# Altium PCB Master-PCB.PcbDoc (part 2 of 3)
Units mil, origin at the board's own origin, x right, y up, seen from the top; angles counter-clockwise.
Board outline 3149.61 x 2348 mil, 2 copper layers (Top Layer, Bottom Layer), stack 57 mil thick; 132 components, 59 nets, 410 pads, 547 vias.
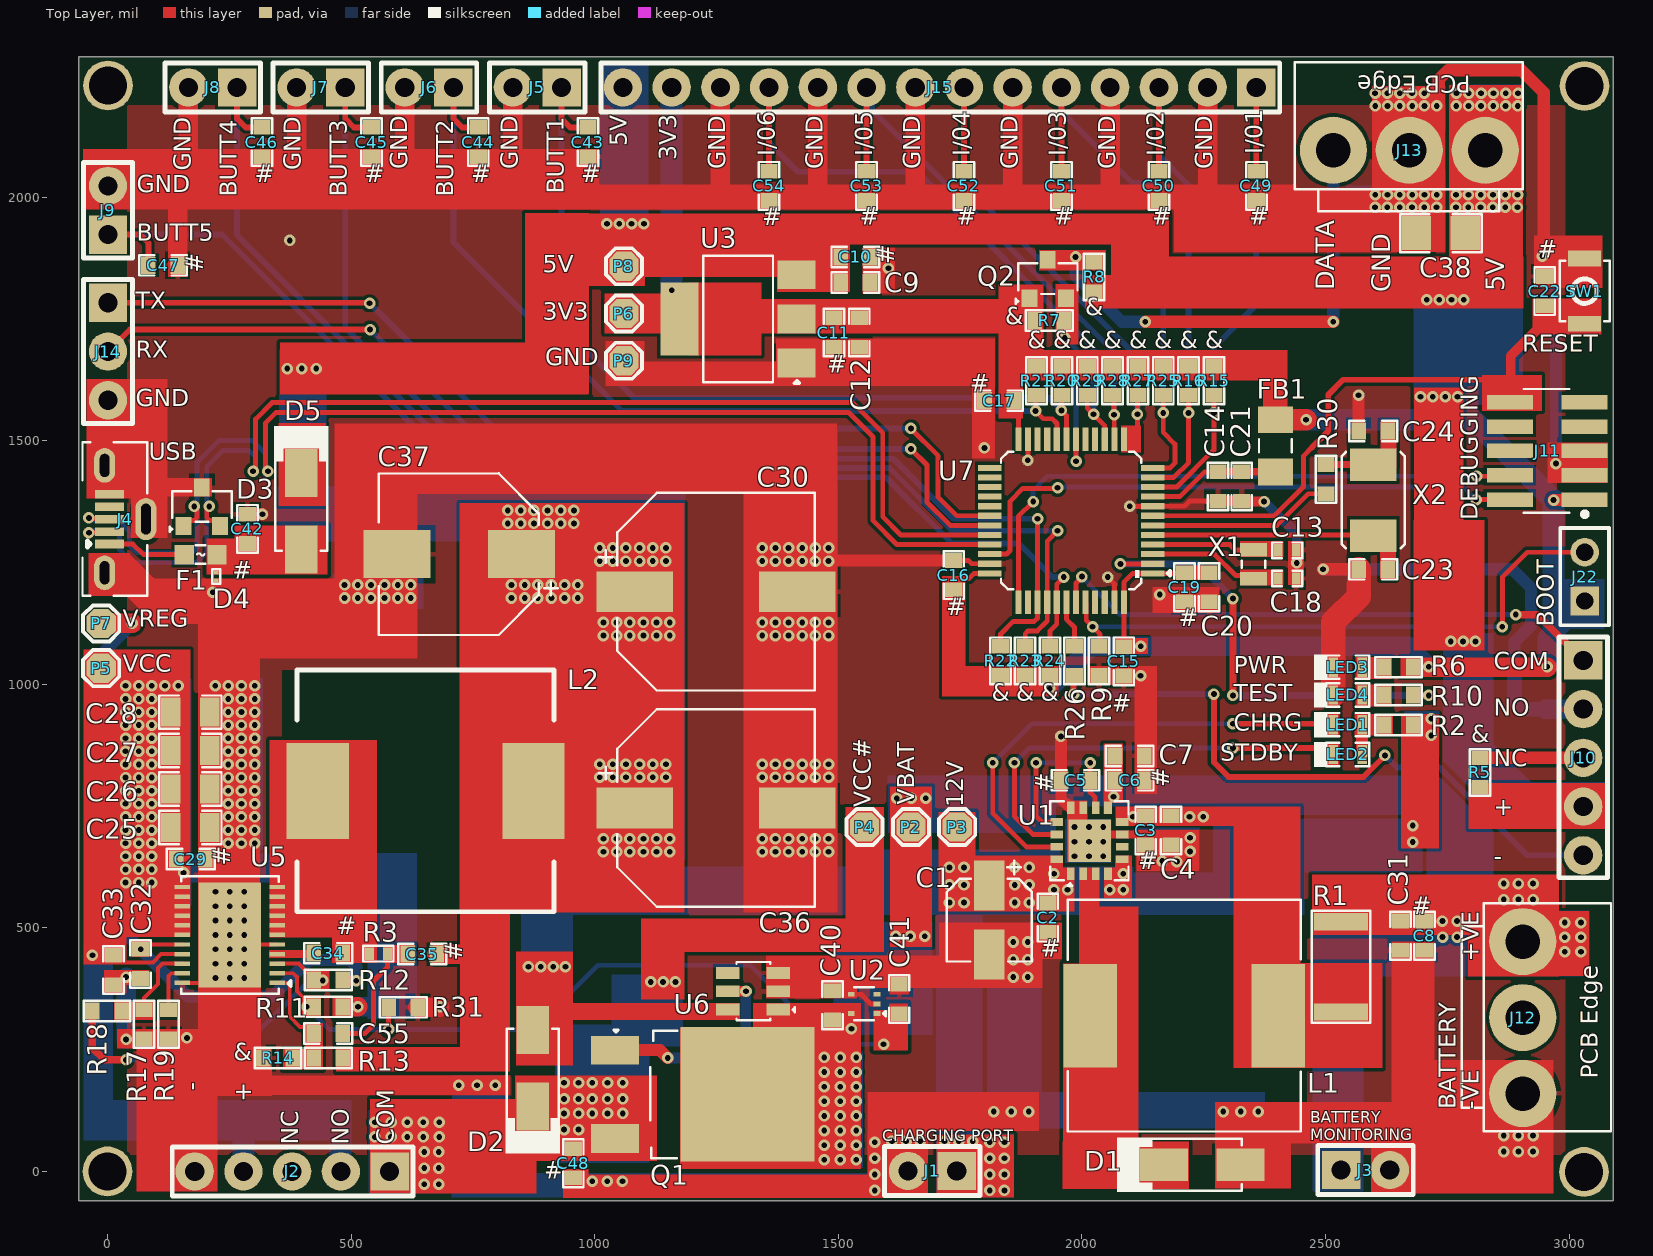
[diagram p0: Top Layer view]

## Part data (continued)
J11: "CONN HEADER SMD 10POS 1.27MM", Color=Black, Contact Resistance=30mR, Current Rating=1A, Insulation Resistance=100MR, LCSC Part Number=C150517, Manufacturer="Amphenol FCI", Max Operating Temperature=85°C, Max Voltage Rating (AC)=125V, Min Operating Temperature=-40°C, Package Quantity=600, Supplier Part Number 1=609-3695-6-ND, ComponentLink1Description=https://www.verical.com/server-webapp/html/getDatasheet?partID=177140&src-supplier=Verical, ComponentLink1URL=https://www.verical.com/server-webapp/html/getDatasheet?partID=177140&src-supplier=Verical, ComponentLink2Description=http://portal.fciconnect.com/Comergent/fci/drawing/20021121.pdf?src-supplier=Avnet, ComponentLink2URL=http://portal.fciconnect.com/Comergent/fci/drawing/20021121.pdf?src-supplier=Avnet, ComponentLink3Description=https://cdn.amphenol-icc.com/media/wysiwyg/files/drawing/20021121.pdf?src-supplier=Digi-Key, ComponentLink3URL=https://cdn.amphenol-icc.com/media/wysiwyg/files/drawing/20021121.pdf?src-supplier=Digi-Key, ComponentLink4Description=http://portal.fciconnect.com/Comergent/fci/drawing/20021121.pdf?src-supplier=Avnet+Europe, ComponentLink4URL=http://portal.fciconnect.com/Comergent/fci/drawing/20021121.pdf?src-supplier=Avnet+Europe, ComponentLink5Description=https://media.digikey.com/pdf/Data%20Sheets/FCI%20PDFs/Minitek%20127_Catalog.pdf?src-supplier=Digi-Key, ComponentLink5URL=https://media.digikey.com/pdf/Data%20Sheets/FCI%20PDFs/Minitek%20127_Catalog.pdf?src-supplier=Digi-Key, ComponentLink6Description=http://portal.fciconnect.com/Comergent//fci/drawing/20021121.pdf?src-supplier=Mouser, ComponentLink6URL=http://portal.fciconnect.com/Comergent//fci/drawing/20021121.pdf?src-supplier=Mouser, Connector Type="Male Pin,Header", Contact Material="Copper Alloy,Copper,Gold", Contact Mating Length=0.12inch, Contact Plating=Gold, Depth=3.4mm, Gender=Male, Housing Color=Black, Housing Material=Thermoplastic, Item Type="Jtag Header", Length=6.35mm, Manufacturer Part Number=20021121-00010C4LF, Mount="Surface Mount", Number of Contacts=10, Number of Positions=10, Number of Rows=2, Orientation=Straight, Packaging="Tape and Reel", Pitch=1.27mm, Pricing 1="1=0.87, 10=0.761, 100=0.6563 (USD)", Radiation Hardening=No, REACH SVHC="No SVHC", Row Spacing=0.05inch, Stack Height=3mm, Stock 1=0, Supplier 1=Digi-Key, Termination=Solder, Voltage Rating=125V
J12: library part B3P-VH(LF)(SN), "1x3P VH 1 3.96mm 3 Brass Plugin,P=3.96mm Wire To Board / Wire To Wire Connector ROHS", LCSC Part Number=C160316, Manufacture="JST Sales America", ComponentLink1Description=LCSC, ComponentLink1URL=https://www.lcsc.com/product-detail/Wire-To-Board-Wire-To-Wire-Connector_JST-Sales-America-B3P-VH-LF-SN_C160316.html, Item Type=Connector, Manufacture part number=B3P-VH(LF)(SN), Pakage=Plugin,P=3.96mm
J13: "1x3P VH 1 3.96mm 3 Brass Plugin,P=3.96mm Wire To Board / Wire To Wire Connector ROHS", LCSC Part Number=C160316, Manufacture="JST Sales America", ComponentLink1Description=LCSC, ComponentLink1URL=https://www.lcsc.com/product-detail/Wire-To-Board-Wire-To-Wire-Connector_JST-Sales-America-B3P-VH-LF-SN_C160316.html, Item Type=Connector, Manufacture part number=B3P-VH(LF)(SN), Pakage=Plugin,P=3.96mm
J14: library part "3P Through Hole Pads", "Wire Connecting Pads", Item Type="Through Hole Pads", Manufacturer Part Number="3P Through Hole Pads"
J15: library part "14P Through Hole Pads", "Wire Connecting Pads", Item Type="Through Hole Pads", Manufacturer Part Number="14P Through Hole Pads"
J22: "KK 254 Breakaway Header, Vertical, 2 Circuits, Tin (Sn) Plating, Mating Pin Length 6.09mm", Color=Black, Contact Resistance=20mR, Current Rating=4A, Flammability Rating="UL94 V-0", LCSC Part Number=C234182, Manufacturer=Molex, Manufacturer Part Number=22-28-4020, Max Operating Temperature=75°C, Max Voltage Rating (AC)=250V, Min Operating Temperature=0°C, Package Quantity=1, Supplier Part Number 1=8967620, Category="Headers and Wire Housings", ComponentLink1Description=https://datasheet.ciiva.com/1433/1596842-1433683.pdf?src-supplier=Element14, ComponentLink1URL=https://datasheet.ciiva.com/1433/1596842-1433683.pdf?src-supplier=Element14, ComponentLink2Description=https://datasheet.ciiva.com/5157/0022284020-pcb-headers-228358-5157523.pdf?src-supplier=Mouser, ComponentLink2URL=https://datasheet.ciiva.com/5157/0022284020-pcb-headers-228358-5157523.pdf?src-supplier=Mouser, ComponentLink3Description=https://datasheet.ciiva.com/30153/214440022284020-pcb-headers-30153261.pdf?src-supplier=Onlinecomponents.com, ComponentLink3URL=https://datasheet.ciiva.com/30153/214440022284020-pcb-headers-30153261.pdf?src-supplier=Onlinecomponents.com, ComponentLink4Description=https://datasheet.ciiva.com/15217/getdatasheetpartid-127875-15217702.pdf?src-supplier=Verical, ComponentLink4URL=https://datasheet.ciiva.com/15217/getdatasheetpartid-127875-15217702.pdf?src-supplier=Verical, ComponentLink5Description=https://datasheet.ciiva.com/10088/0022284020-pcb-headers-10088332.pdf?src-supplier=Avnet, ComponentLink5URL=https://datasheet.ciiva.com/10088/0022284020-pcb-headers-10088332.pdf?src-supplier=Avnet, Connector Type="Male Pin", Contact Material=Brass,Bronze, Contact Mating Length=0.24inch, Contact Plating=Tin, Contact Type="Male Pin", Depth=2.49mm, Gender=Male, Glow Wire Compliant=Non-compliant, Housing Color=Black, Housing Material=Nylon, Item Type=Header, Lead Free="Lead Free", Max Voltage Rating (DC)=250V, Mount="Through Hole", Number of Circuits=2, Number of Contacts=2, Number of Positions=2, Number of Rows=1, Orientation=Straight, Packaging=Bulk, Pitch=2.54mm, Pricing 1="50=0.06100, 150=0.05600, 250=0.05200, 500=0.04900 (GBP)", Radiation Hardening=No, RoHS=Yes, RoHS Compliant=Yes, Series="KK® 42375", Stock 1=29550, Supplier 1=Rs, Termination=Solder, Voltage Rating=250V, Voltage Rating (DC)=250V
L1: library part YPRH1204-220M, "2.9A 22uH ±20% 66mΩ SMD,12x12x5mm Power Inductors ROHS", LCSC Part Number=C338845, Manufacturer=YJYCOIN, Package=SMD,12x12x5mm, ComponentLink1Description=LCSC, ComponentLink1URL=https://www.lcsc.com/product-detail/Power-Inductors_YJYCOIN-YPRH1204-220M_C338845.html, Item Type=Inductor, Manufacturer Part Number=YPRH1204-220M
L2: library part BCIH1367-2R2M, "22A 2.2uH ±20% SMD Power Inductors ROHS", LCSC Part Number=C237973, Manufacturer="BC(Bao Cheng Elec)", Package=SMD, ComponentLink1Description=LCSC, ComponentLink1URL=https://www.lcsc.com/product-detail/Power-Inductors_BC-Bao-Cheng-Elec-BCIH1367-2R2M_C237973.html, Item Type=Inductor, Manufacturer Part Number=BCIH1367-2R2M
LED1: library part NCD0603G2, "Emerald 0603 Light Emitting Diodes (LED) ROHS", LCSC Part Number=C87326, Manufacturer="Foshan NationStar Optoelectronics", Package=0603, ComponentLink1Description=LCSC, ComponentLink1URL=https://www.lcsc.com/product-detail/Light-Emitting-Diodes-LED_Foshan-NationStar-Optoelectronics-NCD0603G2_C87326.html, Item Type=LED, Manufacturer Part Number=NCD0603G2
LED2 LED3 LED4: library part NCD0603R3, "0603 Light Emitting Diodes (LED) ROHS", LCSC Part Number=C3151730, Manufacturer="Foshan NationStar Optoelectronics", Package=0603, ComponentLink1Description=LCSC, ComponentLink1URL=https://www.lcsc.com/product-detail/Light-Emitting-Diodes-LED_Foshan-NationStar-Optoelectronics-NCD0603R3_C3151730.html, Item Type=LED, Manufacturer Part Number=NCD0603R3
P2 P3 P4 P5 P6 P7 P8 P9: "Test Point ON"
Q1: "30V 20A 29W 39mΩ@10V,15A 2.5V@250uA P Channel 1345pF@15V TO-252-2L MOSFETs ROHS", LCSC Part Number=C4748750, Manufacturer="HXY MOSFET", Package=TO-252-2L, ComponentLink1Description=LCSC, ComponentLink1URL=https://www.lcsc.com/product-detail/MOSFETs_HXY-MOSFET-20P03-HXY_C4748750.html, Item Type=Mosfet, Manufacturer Part Number=20P03-HXY
Q2: "50V 220mA 3.5Ω@10V,220mA 225mW 1.6V@1mA N Channel SOT-23 MOSFETs ROHS", LCSC Part Number=C426569, Manufacturer="Slkor(SLKORMICRO Elec.)", Package=SOT-23, ComponentLink1Description=LCSC, ComponentLink1URL=https://www.lcsc.com/product-detail/MOSFETs_Slkor-SLKORMICRO-Elec-BSS138_C426569.html, Item Type=Mosfet, Manufacturer Part Number=BSS138
R1: library part WSL2010R0500FEA, "RES 0.05 OHM 1% 1/2W 2010", Case Code (Imperial)=2010, Case Code (Metric)=5025, LCSC Part Number=C844689, Manufacturer="Vishay Dale", Max Operating Temperature=170°C, Max Power Dissipation=500mW, Min Operating Temperature=-65°C, Package Quantity=1, Resistance=50mR, Resistor Type="Metal Element,Metal Strip", Supplier Part Number 1=WSLE-.05CT-ND, Temperature Coefficient=75ppm/°C, Tolerance=1%, Voltage Rating=150mV, Case/Package=2010, Category="Chip SMD Resistors", ComponentLink1Description=https://datasheet.ciiva.com/2483/wsl-2483729.pdf?src-supplier=Digi-Key, ComponentLink1URL=https://datasheet.ciiva.com/2483/wsl-2483729.pdf?src-supplier=Digi-Key, ComponentLink2Description=https://datasheet.ciiva.com/2483/wsl-2483730.pdf?src-supplier=Digi-Key, ComponentLink2URL=https://datasheet.ciiva.com/2483/wsl-2483730.pdf?src-supplier=Digi-Key, ComponentLink3Description=https://datasheet.ciiva.com/2483/wsl-2483731.pdf?src-supplier=Digi-Key, ComponentLink3URL=https://datasheet.ciiva.com/2483/wsl-2483731.pdf?src-supplier=Digi-Key, ComponentLink4Description=https://datasheet.ciiva.com/7695/wsl-7695158.pdf?src-supplier=Element14, ComponentLink4URL=https://datasheet.ciiva.com/7695/wsl-7695158.pdf?src-supplier=Element14, ComponentLink5Description=https://datasheet.ciiva.com/16215/wsl-16215947.pdf?src-supplier=Future+Electronics, ComponentLink5URL=https://datasheet.ciiva.com/16215/wsl-16215947.pdf?src-supplier=Future+Electronics, ComponentLink6Description=https://datasheet.ciiva.com/17177/wsl-17177243.pdf?src-supplier=Avnet+Europe, ComponentLink6URL=https://datasheet.ciiva.com/17177/wsl-17177243.pdf?src-supplier=Avnet+Europe, ComponentLink7Description=https://datasheet.ciiva.com/28621/1911169-28621837.pdf?src-supplier=Element14, ComponentLink7URL=https://datasheet.ciiva.com/28621/1911169-28621837.pdf?src-supplier=Element14, ComponentLink8Description=https://datasheet.ciiva.com/36857/442550-36857725.pdf?src-supplier=Element14, ComponentLink8URL=https://datasheet.ciiva.com/36857/442550-36857725.pdf?src-supplier=Element14, Contact Plating=Tin,Matte, Depth=2.54mm, Features="Moisture Resistant", Height=0.635mm, Item Type=Resistor, Lead Free="Lead Free", Length=5.08mm, Manufacturer Part Number=WSL2010R0500FEA, Military Standard=Not, Mount="Surface Mount", Number of Pins=2, Number of Terminations=2, Packaging="Tape and Reel", Power Rating=500mW, Pricing 1="1=0.92000, 10=0.81400, 25=0.74800, 50=0.68240, 100=0.59060, 250=0.49876, 500=0.42000, 1000=0.35000 (USD)", Radiation Hardening=No, REACH SVHC="No SVHC", RoHS=No, Stock 1=20000, Supplier 1=Digi-Key, Termination=SMD/SMT, Weight=0.001372oz, Width=0.1inch
R2 R6 R10: library part RT0603DRD071KL, "RES SMD 1K OHM 0.5% 1/10W 0603", Case Code (Imperial)=0603, Case Code (Metric)=1608, LCSC Part Number=C165964, Manufacturer=Yageo, Max Operating Temperature=125°C, Min Operating Temperature=-55°C, Power Rating=100mW, Resistance=1kR, Supplier Part Number 1=311-1.0KDDKR-ND, Temperature Coefficient=25ppm/°C, Tolerance=0.5%, Voltage Rating=75V, Voltage Rating (DC)=50V, Case/Package=0603, ComponentLink1Description=http://www.mouser.com/ds/2/447/yageodocoutput-1125656.pdf?src-supplier=Mouser, ComponentLink1URL=http://www.mouser.com/ds/2/447/yageodocoutput-1125656.pdf?src-supplier=Mouser, ComponentLink2Description=http://www.yageo.com/documents/recent/PYu-RT_1-to-0.05_RoHS_L_6.pdf?src-supplier=Avnet, ComponentLink2URL=http://www.yageo.com/documents/recent/PYu-RT_1-to-0.05_RoHS_L_6.pdf?src-supplier=Avnet, Composition="Thin Film", Contact Plating=Tin,Matte, Lead Free="Lead Free", Manufacturer Part Number=RT0603DRD071KL, Packaging="Tape and Reel", Pricing 1="1=0.2, 10=0.167, 100=0.0651, 1000=0.02725, 2500=0.02498 (USD)", Radiation Hardening=No, Stock 1=178947, Supplier 1=Digi-Key, Termination=SMD/SMT
R3: library part WR04X1541FTL, "62.5mW Thick Film Resistors ±1% 1.54kΩ 0402 Chip Resistor - Surface Mount ROHS", LCSC Part Number=C396136, Manufacturer="Walsin Tech Corp", Package=0402, ComponentLink1Description=LCSC, ComponentLink1URL=https://www.lcsc.com/product-detail/Chip-Resistor-Surface-Mount_Walsin-Tech-Corp-WR04X1541FTL_C396136.html, Item Type=Resistor, Manufacturer Part Number=WR04X1541FTL
R5 R7 R8 R14 R15 R16 R20 R21 R22 R23 R24 R25 R27 R28 R29: library part RT0603BRD0710KL, "RES SMD 10K OHM 0.1% 1/10W 0603", Case/Package=0603, LCSC Part Number=C95204, Manufacturer=Yageo, Max Operating Temperature=155°C, Min Operating Temperature=-55°C, Package Height=0.45mm, Package Length=1.6mm, Package Style=SMTMeter, Package Width=0.8mm, Power=100mW, Rated Temperature=70°C, Resistor Type="FIXED RESISTOR", Supplier Part Number 1=1991391P, Temperature Coefficient=25ppm/°C, Tolerance=0.1%, Working Voltage=75V, Category="Chip SMD Resistors", ComponentLink1Description=https://datasheet.ciiva.com:443/pdfs/VipMasterIC/IC/YAGO/YAGO-S-A0008510989/YAGO-S-A0008510989-1.pdf?src-supplier=IHS+Markit, ComponentLink1URL=https://datasheet.ciiva.com:443/pdfs/VipMasterIC/IC/YAGO/YAGO-S-A0008510989/YAGO-S-A0008510989-1.pdf?src-supplier=IHS+Markit, ComponentLink2Description=https://datasheet.ciiva.com/5624/pyu-rt-1-to-0-05-rohs-l-4-5624351.pdf?src-supplier=Mouser, ComponentLink2URL=https://datasheet.ciiva.com/5624/pyu-rt-1-to-0-05-rohs-l-4-5624351.pdf?src-supplier=Mouser, ComponentLink3Description=https://datasheet.ciiva.com/29721/pyu-rt-1-to-0-05-rohs-l-4-29721177.pdf?src-supplier=Digi-Key, ComponentLink3URL=https://datasheet.ciiva.com/29721/pyu-rt-1-to-0-05-rohs-l-4-29721177.pdf?src-supplier=Digi-Key, Construction=Chip, Item Type=Resistor, Manufacturer Part Number=RT0603BRD0710KL, Mounting Technology="Surface Mount", Packaging="Tape and Reel", Pins=2, Pricing 1="100=0.29800, 250=0.27800, 500=0.25900, 1000=0.23700 (GBP)", Reach SVHC Compliant=Yes, RoHS=Yes, RoHS Compliant=Yes, Stock 1=20510, Supplier 1=Rs, Technology="THIN FILM", Termination=Wraparound
R9: library part RT0603BRD0733KL, "RES SMD 33K OHM 0.1% 1/10W 0603", Case Code (Imperial)=0603, Case Code (Metric)=1608, LCSC Part Number=C705768, Manufacturer=Yageo, Max Operating Temperature=125°C, Max Power Dissipation=100mW, Min Operating Temperature=-55°C, Package Quantity=5000, Resistance=33kR, Resistor Type="Thin Film", Temperature Coefficient=25ppm/°C, Voltage Rating=75V, Voltage Rating (DC)=50V, Case/Package=0603, Category="Chip SMD Resistors", ComponentLink1Description=https://datasheet.ciiva.com/2585/pyu-rt-1-to-0-05-rohs-l-4-2585891.pdf?src-supplier=Digi-Key, ComponentLink1URL=https://datasheet.ciiva.com/2585/pyu-rt-1-to-0-05-rohs-l-4-2585891.pdf?src-supplier=Digi-Key, ComponentLink2Description=https://datasheet.ciiva.com/12810/pyu-rt-1-to-0-05-rohs-l-4-12810117.pdf?src-supplier=Mouser, ComponentLink2URL=https://datasheet.ciiva.com/12810/pyu-rt-1-to-0-05-rohs-l-4-12810117.pdf?src-supplier=Mouser, ComponentLink3Description=https://datasheet.ciiva.com/8889/pyu-rt-1-to-0-05-rohs-l-4-8889590.pdf?src-supplier=Avnet, ComponentLink3URL=https://datasheet.ciiva.com/8889/pyu-rt-1-to-0-05-rohs-l-4-8889590.pdf?src-supplier=Avnet, Construction=Rectangular, Contact Plating=Tin,Matte, Depth=0.8mm, Features="Moisture Resistant", Height=0.022inch, Lead Free="Lead Free", Length=1.6mm, Manufacturer Part Number=RT0603BRD0733KL, Military Standard=Not, Number of Terminations=2, Packaging="Tape and Reel", Power Rating=100mW, Pricing 1="1=0.30860 (USD)", Radiation Hardening=No, RoHS=Yes, RoHS Compliant=Yes, Series=RT, Size Code=0603, Stock 1=2, Supplier 1="Arrow Electronics", Supplier Part Number 1=RT0603BRD0733KL, Termination=SMD/SMT, Weight=7.1E-05oz, Width=0.031inch
R11 R12: library part RC0603JR-07100KL, "RES 100K OHM 5% 1/10W 0603", Case Code (Imperial)=0603, Case Code (Metric)=1608, LCSC Part Number=C100048, Manufacturer=Yageo, Max Operating Temperature=155°C, Max Power Dissipation=100mW, Min Operating Temperature=-55°C, Resistance=100kR, Resistance Tolerance=5%, Resistor Type="Thick Film", Supplier Part Number 1=311-100KGRCT-ND, Temperature Coefficient=100ppm/°C, Voltage Rating=50V, Case/Package=0603, Category="Chip SMD Resistors", ComponentLink1Description=https://datasheet.ciiva.com/7746/443971-7746424.pdf?src-supplier=Element14, ComponentLink1URL=https://datasheet.ciiva.com/7746/443971-7746424.pdf?src-supplier=Element14, ComponentLink2Description=https://datasheet.ciiva.com/7983/443971-7983686.pdf?src-supplier=Element14, ComponentLink2URL=https://datasheet.ciiva.com/7983/443971-7983686.pdf?src-supplier=Element14, ComponentLink3Description=https://datasheet.ciiva.com/7746/443971-7746423.pdf?src-supplier=Element14, ComponentLink3URL=https://datasheet.ciiva.com/7746/443971-7746423.pdf?src-supplier=Element14, ComponentLink4Description=https://datasheet.ciiva.com/8887/pyu-rc0603-51-rohs-l-4-8887903.pdf?src-supplier=Avnet, ComponentLink4URL=https://datasheet.ciiva.com/8887/pyu-rc0603-51-rohs-l-4-8887903.pdf?src-supplier=Avnet, Contact Plating=Tin,Matte, Features="Moisture Resistant", Lead Free="Lead Free", Manufacturer Part Number=RC0603JR-07100KL, Number of Pins=2, Number of Terminations=2, Packaging="Tape and Reel", Power Rating=100mW, Pricing 1="1=0.10000, 10=0.02000, 100=0.00800, 1000=0.00360, 2500=0.00312 (USD)", Radiation Hardening=No, REACH SVHC="No SVHC", RoHS=Yes, RoHS Compliant=Yes, Series=RC, Size Code=0603, Stock 1=1210037, Supplier 1=Digi-Key, Termination=SMD/SMT, Tolerance=5%, Voltage Rating (DC)=50V, Width=0.8mm
R13: library part RT0603BRD0773K2L, "RES SMD 73.2KOHM 0.1% 1/10W 0603", Case Code (Imperial)=0603, Case Code (Metric)=1608, LCSC Part Number=C861548, Manufacturer=Yageo, Max Operating Temperature=125°C, Min Operating Temperature=-55°C, Power Rating=100mW, Supplier Part Number=YAG4591CT-ND, Temperature Coefficient=25ppm/°C, Tolerance=0.1%, Voltage Rating=75V, Voltage Rating (DC)=50V, Case/Package=0603, Category="Chip SMD Resistors", ComponentLink1Description=https://datasheet.ciiva.com/12810/pyu-rt-1-to-0-05-rohs-l-4-12810634.pdf?src-supplier=Mouser, ComponentLink1URL=https://datasheet.ciiva.com/12810/pyu-rt-1-to-0-05-rohs-l-4-12810634.pdf?src-supplier=Mouser, Height=0.45mm, Item Type=Resistor, Lead Free="Lead Free", Length=1.6mm, Manufacturer Part Number=RT0603BRD0773K2L, Packaging="Tape and Reel", Pricing="1=0.34, 10=0.288, 100=0.1126, 500=0.06812, 1000=0.04716, 2500=0.04322 (USD)", RoHS=Yes, RoHS Compliant=Yes, Series=RT, Stock=4471, Supplier=Digi-Key, Termination=SMD/SMT, Weight=7.1E-05oz, Width=0.8mm
R17: library part RC0603FR-07475KL, "RES 475K OHM 1% 1/10W 0603", LCSC Part Number=C137717, Manufacturer=YAGEO, Item Type=Resistor, Manufacturer Part Number=RC0603FR-07475KL
R18: library part RC0603FR-07200KL, "RES SMD 200K OHM 1% 1/10W 0603", LCSC Part Number=C105574, Manufacturer=Yageo, Package=0603, ComponentLink3Description=LCSC, ComponentLink3URL=https://www.lcsc.com/product-detail/Chip-Resistor-Surface-Mount_YAGEO-RC0603FR-07200KL_C105574.html, Item Type=Resistor, Manufacturer Part Number=RC0603FR-07200KL
R19: library part RT0603DRD07147KL, "RES SMD 147K OHM 0.5% 1/10W 0603", Case Code (Imperial)=0603, Case Code (Metric)=1608, LCSC Part Number=C728612, Manufacturer=Yageo, Max Operating Temperature=155°C, Max Power Dissipation=100mW, Min Operating Temperature=-55°C, Package Quantity=10, Supplier Part Number 1=603-RT0603DRD07147KL, Temperature Coefficient=25ppm/°C, Tolerance=0.5%, Voltage Rating (DC)=50V, Case/Package=0603, Category="Chip SMD Resistors", ComponentLink1Description=http://www.yageo.com/documents/recent/PYu-RT_1-to-0.01_RoHS_L_9.pdf?src-supplier=Digi-Key, ComponentLink1URL=http://www.yageo.com/documents/recent/PYu-RT_1-to-0.01_RoHS_L_9.pdf?src-supplier=Digi-Key, Height=0.45mm, Item Type=Resistor, Lead Free="Lead Free", Length=1.6mm, Manufacturer Part Number=RT0603DRD07147KL, Number of Terminations=2, Packaging="Tape and Reel", Power Rating=100mW, Pricing 1="1=0.18000, 10=0.14700, 50=0.14700, 100=0.05600, 1000=0.02400, 10000=0.01800 (USD)", RoHS=Yes, RoHS Compliant=Yes, Series=RT, Stock 1=1848, Supplier 1=Mouser, Width=0.8mm
R26: library part RT0603DRD07200RL, "RES SMD 200 OHM 0.5% 1/10W 0603", Case/Package=0603, LCSC Part Number=C700498, Manufacturer=Yageo, Power Rating=100mW, Supplier Part Number 1=311-200DCT-ND, Tolerance=0.5%, Voltage Rating (DC)=50V, Lead Free="Lead Free", Manufacturer Part Number=RT0603DRD07200RL, Packaging="Cut Tape", Pricing 1="1=0.21, 10=0.174, 100=0.0682, 1000=0.02855, 2500=0.02617 (USD)", Resistance=200R, Stock 1=19572, Supplier 1=Digi-Key
R30: library part RC0603JR-07390RL, "RES SMD 390 OHM 5% 1/10W 0603", LCSC Part Number=C137632, Manufacturer=Yageo, Package=0603, ComponentLink4Description=LCSC, ComponentLink4URL=https://www.lcsc.com/product-detail/Chip-Resistor-Surface-Mount_YAGEO-RC0603JR-07390RL_C137632.html, Item Type=Resistor, Manufacturer Part Number=RC0603JR-07390RL
R31: library part PNM0603E5002BST5, "RES SMD 50K OHM 0.1% 0.15W 0603", Case Code (Imperial)=0603, Case Code (Metric)=1608, LCSC Part Number=C2073717, Manufacturer="Vishay Dale Thin Film", Max Operating Temperature=125°C, Min Operating Temperature=-55°C, Power Rating=150mW, Resistance=50kR, Supplier Part Number 1=PNM0603-50KBDKR-ND, Temperature Coefficient=25ppm/°C, Tolerance=0.1%, Voltage Rating=75V, Case/Package=0603, ComponentLink1Description=LCSC, ComponentLink1URL=https://www.lcsc.com/product-detail/Chip-Resistor-Surface-Mount_Vishay-Intertech-PNM0603E5002BST5_C2073717.html, Composition="Thin Film", Contact Plating=Copper,Tin,Silver, Height=0.02inch, Length=0.064inch, Manufacturer Part Number=PNM0603E5002BST5, Packaging="Tape and Reel", Pricing 1="1=3.07, 10=2.743, 100=2.0299 (USD)", Radiation Hardening=No, REACH SVHC=Unknown, Stock 1=16518, Supplier 1=Digi-Key, Termination=SMD/SMT, Voltage Rating (DC)=75V, Width=0.032inch
SW1: "SWITCH TACTILE SPST-NO 0.05A 12V", Contact Current Rating=50mA, Contact Resistance=100mR, Insulation Resistance=100MR, LCSC Part Number=C231329, Manufacturer=Omron, Max Operating Temperature=70°C, Max Voltage Rating (DC)=12V, Min Operating Temperature=-25°C, Operating Force=1.5N, Package Quantity=1, Ratings="Dust Proof,IP40", Supplier Part Number 1=SW1020DKR-ND, Actuator Length=0.4mm, Actuator Type=Standard, ComponentLink1Description=http://www.farnell.com/datasheets/60838.pdf?src-supplier=Farnell, ComponentLink1URL=http://www.farnell.com/datasheets/60838.pdf?src-supplier=Farnell, ComponentLink2Description=http://www.farnell.com/datasheets/60838.pdf?src-supplier=Element14, ComponentLink2URL=http://www.farnell.com/datasheets/60838.pdf?src-supplier=Element14, ComponentLink3Description=https://omronfs.omron.com/en_US/ecb/products/pdf/en-b3u.pdf?src-supplier=Digi-Key, ComponentLink3URL=https://omronfs.omron.com/en_US/ecb/products/pdf/en-b3u.pdf?src-supplier=Digi-Key, ComponentLink4Description=http://www.omron.com/ecb/products/pdf/en-b3u.pdf?src-supplier=Digi-Key, ComponentLink4URL=http://www.omron.com/ecb/products/pdf/en-b3u.pdf?src-supplier=Digi-Key, ComponentLink5Description=https://www.distrelec.biz/Web/Downloads/he/et/B3U_eng_datasheet.pdf?mime=application%2Fpdf&src-supplier=Distrelec, ComponentLink5URL=https://www.distrelec.biz/Web/Downloads/he/et/B3U_eng_datasheet.pdf?mime=application%2Fpdf&src-supplier=Distrelec, ComponentLink6Description=http://www.onlinecomponents.com/productFiles/mf-OM/en-b3u.pdf?src-supplier=Onlinecomponents.com, ComponentLink6URL=http://www.onlinecomponents.com/productFiles/mf-OM/en-b3u.pdf?src-supplier=Onlinecomponents.com, ComponentLink7Description=https://www.verical.com/server-webapp/html/getDatasheet?partID=552554&src-supplier=Verical, ComponentLink7URL=https://www.verical.com/server-webapp/html/getDatasheet?partID=552554&src-supplier=Verical, ComponentLink8Description=http://www.farnell.com/datasheets/1685550.pdf?src-supplier=Element14, ComponentLink8URL=http://www.farnell.com/datasheets/1685550.pdf?src-supplier=Element14, ComponentLink9Description=http://www.farnell.com/datasheets/2610940.pdf?src-supplier=Farnell, ComponentLink9URL=http://www.farnell.com/datasheets/2610940.pdf?src-supplier=Farnell, ComponentLink10Description=https://www.alliedelec.com/m/d/4c8a9ef82804fc3c241a13c1e298fd73.pdf?src-supplier=Allied+Electronics, ComponentLink10URL=https://www.alliedelec.com/m/d/4c8a9ef82804fc3c241a13c1e298fd73.pdf?src-supplier=Allied+Electronics, Contact Material=Silver, Current Rating=50mA, Depth=2.5mm, Electrical Life=200000Cycles, Height=1.2mm, Illumination Type=Non-Illuminated,Illuminated, Item Type=Switch, Lead Free="Lead Free", Length=4mm, Manufacturer Part Number=B3U-1000P, Max Current Rating=50mA, Mechanical Life=200000Cycles, Mount="Surface Mount", Orientation=Straight, Packaging="Tape and Reel", Pricing 1="1=1, 10=0.961, 25=0.9064, 50=0.7976, 100=0.7251, 250=0.68888, 500=0.67074, 1000=0.52571 (USD)", REACH SVHC=Unknown, Stock 1=116454, Supplier 1=Digi-Key, Switch Function=Off-Mom, Switch Travel=0.15mm, Termination=SMD/SMT, Throw Configuration=SPST, Voltage Rating (DC)=12V, Weight=0.000776oz, Width=3mm
U1: "TQFN-16-EP(4x4) Battery Management ICs ROHS", LCSC Part Number=C379389, Manufacturer="TOPPOWER(Nanjing Extension Microelectronics)", Package=TQFN-16-EP(4x4), ComponentLink1Description=LCSC, ComponentLink1URL=https://www.lcsc.com/product-detail/Battery-Management-ICs_TOPPOWER-Nanjing-Extension-Microelectronics-TP5100_C379389.html, Item Type=IC, Manufacturer Part Number=TP5100
U2: "IC SUPERVISOR 1 CHANNEL 5VSOF", Case/Package=VSOF, LCSC Part Number=C509824, Manufacturer=Rohm, Max Operating Temperature=105°C, Max Power Dissipation=210mW, Max Reset Threshold Voltage=6.09V, Max Supply Current=1.98uA, Max Supply Voltage=10V, Min Operating Temperature=-40°C, Min Reset Threshold Voltage=5.91V, Min Supply Voltage=1.2V, Number of Voltages Monitored=1, Operating Supply Current=900nA, Package Quantity=3000, Supplier Part Number 1=BD4860FVE-CT-ND, Threshold Voltage=6V, Accuracy=1%, Category="Voltage Supervisors", ComponentLink1Description=https://datasheet.ciiva.com/1974/bd48xxg-e-1974994.pdf?src-supplier=Digi-Key, ComponentLink1URL=https://datasheet.ciiva.com/1974/bd48xxg-e-1974994.pdf?src-supplier=Digi-Key, ComponentLink2Description=https://datasheet.ciiva.com/8133/bd48xxg-e-8133113.pdf?src-supplier=Avnet, ComponentLink2URL=https://datasheet.ciiva.com/8133/bd48xxg-e-8133113.pdf?src-supplier=Avnet, Item Type=IC, Lead Free="Lead Free", Manufacturer Part Number=BD4860FVE-TR, Mounting Technology="Surface Mount", Number of Monitored Inputs=1, Packaging="Tape and Reel", Pins=5, Pricing 1="1=0.64000, 10=0.54900, 25=0.51200, 100=0.40960, 250=0.38032, 500=0.32182, 1000=0.24868 (USD)", Reset="Active Low", RoHS=Yes, RoHS Compliant=Yes, Series=BD48xxx, Stock 1=5990, Supplier 1=Digi-Key, Type="Simple Reset/Power-On Reset,Voltage Detector", Watchdog Timer=No
U3: "15V 1.3V @ 800mA Fixed 3.3V SOT-223 Linear Voltage Regulators (LDO) ROHS", LCSC Part Number=C92102, Manufacturer="Diodes Incorporated", Package=SOT-223, Item Type=IC, Manufacturer Part Number=AZ1117CH-3.3TRG1
U5: "IC REG BUCK ADJUSTABLE 14A 22SON", Case/Package=SON, LCSC Part Number=C181971, Manufacturer="Texas Instruments", Max Input Voltage=22V, Max Operating Temperature=85°C, Max Output current=14A, Max Output Voltage=5.5V, Min Input Voltage=1.5V, Min Operating Temperature=-40°C, Min Output Voltage=600mV, Package Quantity=2500, Quiescent Current=320uA, Switching Frequency=1MHz, Category="Voltage Regulators - Switching", ComponentLink1Description=https://datasheet.ciiva.com/6605/tps53318-6605682.pdf?src-supplier=Digi-Key, ComponentLink1URL=https://datasheet.ciiva.com/6605/tps53318-6605682.pdf?src-supplier=Digi-Key, ComponentLink2Description=LCSC, ComponentLink2URL=https://www.lcsc.com/product-detail/DC-DC-Converters_Texas-Instruments-TPS53319DQPR_C181971.html, Contact Plating=Gold, Efficiency=91%, Item Type=IC, Lead Free="Contains Lead", Manufacturer Part Number=TPS53319DQPR, Mount="Surface Mount", Number of Outputs=1, Number of Pins=22, Output Configuration=Positive, Output Current=14A, Output Type=Adjustable, Output Voltage=5.5V, Packaging="Tape and Reel", Radiation Hardening=No, RoHS=Yes, RoHS Compliant=Yes, Series="D-CAP™, Eco-Mode™", Supplier 1=Newark, Synchronous Rectifier=Yes
U6: "IC OR CTRLR SRC SELECT TSOT23-6", Case/Package=SOT-23-6, LCSC Part Number=C521306, Manufacturer="Analog Devices / Linear Technology", Max Operating Temperature=85°C, Min Operating Temperature=-40°C, Operating Supply Current=15uA, Package Quantity=2500, Supplier Part Number 1=LTC4412IS6#TRPBFCT-ND, Category=Uncategorized, ComponentLink1Description=https://datasheet.ciiva.com/1960/1527-1960891.pdf?src-supplier=Digi-Key, ComponentLink1URL=https://datasheet.ciiva.com/1960/1527-1960891.pdf?src-supplier=Digi-Key, Item Type=IC, Length=2.9mm, Manufacturer Part Number=LTC4412IS6#TRPBF, Number of Pins=6, Packaging="Tape and Reel", Pricing 1="1=3.90000, 10=3.50700, 25=3.31520, 100=2.87310, 250=2.72580, 500=2.44584, 1000=2.08500 (USD)", RoHS=Yes, RoHS Compliant=Yes, Series=PowerPath™, Stock 1=2608, Supplier 1=Digi-Key, Turn-Off Delay Time=13us, Turn-On Delay Time=110us
U7: "IC MCU 32BIT 128KB FLASH 48LQFP", Case/Package=LQFP, Frequency=48MHz, LCSC Part Number=C2053863, Manufacturer=STMicroelectronics, Max Operating Temperature=85°C, Min Operating Temperature=-40°C, Supplier Part Number 1=497-18745-6-ND, Category=Microcontrollers, ComponentLink1Description=http://www.mouser.com/ds/2/389/stm32f070c6-956182.pdf?src-supplier=Mouser, ComponentLink1URL=http://www.mouser.com/ds/2/389/stm32f070c6-956182.pdf?src-supplier=Mouser, ComponentLink2Description=http://www.st.com/content/ccc/resource/technical/document/datasheet/31/4f/10/5f/a5/32/46/42/DM00141386.pdf/files/DM00141386.pdf/jcr:content/translations/en.DM00141386.pdf?src-supplier=Digi-Key, ComponentLink2URL=http://www.st.com/content/ccc/resource/technical/document/datasheet/31/4f/10/5f/a5/32/46/42/DM00141386.pdf/files/DM00141386.pdf/jcr:content/translations/en.DM00141386.pdf?src-supplier=Digi-Key, Core Architecture=ARM, Interface=I2C,SPI,USB,UART,USART, Item Type=IC, Lead Free="Lead Free", Manufacturer Part Number=STM32F070CBT6TR, Memory Size=128KB, Memory Type=FLASH, Number of I/Os=37, Oscillator Type=Internal, Packaging="Tape and Reel", Peripherals=POR,PWM,WDT,DMA, Pricing 1="1=3.40000, 10=3.05100, 25=2.87800, 100=2.45200, 250=2.30232, 500=2.01452, 1000=1.91860 (USD)", RoHS=Yes, RoHS Compliant=Yes, Supplier 1=Digi-Key
X1: library part FC-12M32.768KHZ7PF20PPM, "CRYSTAL 32.7680KHZ 9PF SMD", LCSC Part Number=C99009, Manufacturer="Seiko Epson", Package=SMD2012-2P, ComponentLink1Description=LCSC, ComponentLink1URL=https://www.lcsc.com/product-detail/Crystals_Seiko-Epson-FC-12M32-768KHZ7PF20PPM_C99009.html, Item Type=Crystal, Manufacturer Part Number=FC-12M32.768KHZ7PF20PPM
X2: library part X50328MSB2GI, "8MHz 20pF ±10ppm ±50ppm SMD5032-2P Crystals ROHS", LCSC Part Number=C115962, Manufacturer="Yangxing Tech", Package=SMD5032-2P, ComponentLink1Description=LCSC, ComponentLink1URL=https://www.lcsc.com/product-detail/Crystals_Yangxing-Tech-X50328MSB2GI_C115962.html, Item Type=Crystal, Manufacturer Part Number=X50328MSB2GI

## Free pads (board coordinates)
  round 102.36 hole 78.74 unplated mask+1.97: MH(0,0) MH(1,2229) MH(3030.61,-1) MH(3031.61,2228)

## Via types
v1: diameter 23.62, hole 11.81, Top Layer to Bottom Layer, 545 vias
v2: diameter 23.62, hole 11.81, Top Layer to Bottom Layer, tented both sides, 2 vias

## Nets (pads, with @x,y where several pads share a name; then routed paths per layer and width w, separated by ;. In a path a pad name is that pad's centre, name@x,y a point inside that pad or via, vN(x,y) a via of type N, cw(c..) or ccw(c..) an arc to the next point about the centre after c; other vN are vias at no path point)
3V3: C11.2 C12.2 C15.2 C16.2 C17.2 C19.2 C20.2 FB1.1 J11.1 J15.13 J22.1 P6.1 Q2.1 R6.2 R7.2 R15.1 R16.1 R20.2 R21.2 R22.2 R23.2 R24.2 R25.1 R27.1 R28.1 R29.1 U3.2 U3.4 U7.1 U7.24 U7.36 U7.48 | length 3322.4
  Top Layer w10: C16.2@1726,1194 C16.2@1737,1194 1737,1201 1753,1217 1768,1217 1778.73,1227.73 U7.36@1810.68,1227.73 ; C17.2@1860,1582 1859,1581 1869.73,1570.27 U7.24@1869.73,1503.32 ; C15.2@2086.27,1077.27 U7.48@2086.27,1168.68 2086.27,1209.27 2104.73,1227.73 U7.1@2145.32,1227.73 2259.73,1227.73 C20.2@2261,1229 C20.2@2269,1229
  Top Layer w25: v1(1934,991) 1934,1017.8 R24.2@1934.2,1018 ; C15.2@2086,1077 2086.27,1077.27 C15.2@2086.77,1077.77 ; v1@2120.77,1077.77 v1(2121,1078) ; v1(2968,1378) 3031,1378 J11.1@3032,1379
  Top Layer w40: FB1.1@2397,1543.09 FB1.1@2397.09,1543 ; R6.2@2680,1035 v1@2955,1035
  Top Layer w45: FB1.1@2397.09,1543 v1(2460,1543)
  Top Layer w50: FB1.1@2397,1543.09 2397,1621
  Bottom Layer w25: 2969.14,1144.5 2992.64,1168 3003,1168 3006,1171 J22.1@3009,1174
  Bottom Layer w40: v1(1934,991) 2021,1078 v1(2121,1078) 2670,1078 v1(2712,1036) ; v1(2955,1036) 2955,1094 J22.1@3032,1171
  Bottom Layer w45: v1(1158,1809) J15.13@1158,2225 ; v1(2460,1543) 2803,1543 v1(2968,1378) 2968,1187 2984,1171 3006,1171 J22.1@3032,1171
5V_USB: C42.2 D4.1 D5.2 F1.2
12V: C1.1 C2.2 D2.2 J1.1 P3.1 R2.1 U1.1 U1.4 U1.5 U1.16 U6.6 | length 168.2
  Top Layer w10: R2.1@2679,915 R2.1@2680,916
  Top Layer w22: 904,360.74 904,355.06 926.46,332.6
  Top Layer w40: v1@888,429 890.54,426.46 890.54,389.95 904,376.49 904,360.74
  Bottom Layer w40: 886,546 915,575 ; 1715,550 v1@1722,557 ; 2078,588 2078,591.5
  other v1: 1811,-39 1841,-39 1811,-6 1841,-6 1811,27 1841,27 1811,60 1841,60 1718,62 1747,62 1776,62 864,420 889.33,420 914.67,420 940,420 1728,552 1758,552 1862,552 1892,552 1942.7,578 1970.7,578 2057,578 2085,578 1728,588 1758,588 1862,588 1892,588 1942.7,611 2085,611 1728,624 1758,624 1862,624 1892,624 2679,676 2679,710 2717,895 2717,929
BOOT: J22.2 R9.1 U7.44 | length 1224.2
  Top Layer w10: U7.44@2007.53,1168.68 2008.83,1167.38 2008.83,1131.17 v1(2022,1118) 2037.4,1102.6 2037.4,1093 ; v1@2863,1115 v1(2863,1118) 2863,1220 2914,1271 J22.2@3032,1271
  Bottom Layer w10: v1(2022,1118) v1(2863,1118)
BUCK_EN: C41.2 R11.2 R31.2 U2.1 U5.2 | length 1483.9
  Top Layer w8: U5.2@348.44,406.79 381.14,406.79 389,398.93 389,370 409,350 R11.2@409,338.5
  Top Layer w10: v1(576.95,291.67) v1(576.95,291.67) R31.2@577,337 ; C41.2@1625,324.31 C41.2@1625.69,325
  Bottom Layer w10: v1(409,338) 455.33,291.67 v1(576.95,291.67) 875.02,291.67 1006.73,423.39 1319.61,423.39 1482,261 v1(1593,261)
BUTT1: C43.2 J5.1 R20.1 U7.19 | length 1810.3
  Top Layer w10: v1@1958,1559.49 v1(1958,1562) ; R20.1@1959,1593 1958,1592 v1(1958,1562) ; U7.19@1968.16,1503.32 1968.16,1551.84 v1(1958,1562)
  Top Layer w12: J5.1@932,2227 932,2161 950,2143 C43.2@983,2143
  Bottom Layer w12: J5.1@932,2227 932,1736 1080,1588 1932,1588 v1(1958,1562)
BUTT2: C44.2 J6.1 R21.1 U7.20 | length 1902.1
  Top Layer w10: R21.1@1907,1593 1905,1591 v1(1905,1561) 1921,1545 1939,1545 1948.81,1535.19 1948.81,1503.66 U7.20@1948.47,1503.32
  Top Layer w12: J6.1@710,2227 710,2161 728,2143 C44.2@761,2143
  Bottom Layer w12: J6.1@710,2227 710,1907 1056,1561 v1(1905,1561)
BUTT3: C45.2 J7.1 R22.1 U7.39 | length 2521.1
  Top Layer w10: R22.1@1833,1078 1833,1103 1859,1129 1902.17,1129 1909.1,1135.94 U7.39@1909.1,1168.68 U7.39@1909.1,1168.68 1909.05,1294.76 1909,1294.81 v1(1909,1339.81)
  Top Layer w12: J7.1@488,2227 488,2161 506,2143 C45.2@539,2143
  Bottom Layer w12: J7.1@488,2227 488,1732 757,1463 1613,1463 1736.19,1339.81 1907.38,1339.81 v1@1908.19,1339
BUTT4: C46.2 J8.1 R23.1 U7.40 | length 2638.8
  Top Layer w10: R23.1@1883.6,1078 1883.6,1103.74 1889.46,1109.6 1908.6,1109.6 1928.79,1129.79 U7.40@1928.79,1168.68 1928.89,1168.78 1928.89,1293.89 v1(1950,1315)
  Top Layer w12: J8.1@266,2227 J8.1@266,2225 266,2161 284,2143 C46.2@317,2143
  Bottom Layer w12: J8.1@266,2225 266,1921.7 743.7,1444 1605.13,1444 1734.13,1315 v1(1950,1315)
BUTT5: C47.2 J9.1 R24.1 U7.41 | length 2544.2
  Top Layer w10: R24.1@1934.2,1078 1934.2,1109.2 1948.47,1123.47 U7.41@1948.47,1168.68 1948.47,1205.47 v1(1963,1220)
  Top Layer w12: J9.1@1,1923 67,1923 84,1906 C47.2@84,1859
  Bottom Layer w12: J9.1@1,1923 235,1923 733,1425 1597.26,1425 1733.38,1288.88 1870.12,1288.88 1939,1220 v1(1963,1220)
C\R\H\G\: LED1.2 U1.15 | length 996.6
  Top Layer w10: v1(1817,839) 1817,735 1885.81,666.19 U1.15@1948.09,666.19
  Top Layer w12: v1(2310,919) 2514,919 LED1.2@2516,917
  Bottom Layer w10: v1(1817,839) 1897,919 v1(2310,919)
CS_CELL: C5.2 U1.10 U1.13 | length 368.6
  Top Layer w10: v1(1906,839) 1906,729 1917.32,717.68 1947.77,717.68 U1.13@1948.09,717.37 ; v1(2017,839) C5.2@2017,803 2017,778 2027.18,767.82 2027.18,747.85 U1.10@2028.15,746.89 ; v1@2018,837 v1@2018,841
  Bottom Layer w10: v1(1906,839) v1(2017,839)
GATE: Q1.1 U6.5 | length 423.2
  Top Layer w22: U6.5@1273.43,370 v1(1310.55,370)
  Top Layer w25: Q1.1@1042,249 1134,249 v1(1150,233)
  Bottom Layer w22: v1(1150,233) 1266,233 1310.24,277.24 1310.24,369.69 v1(1310.55,370)